# Altium PCB CoproMKII.PcbDoc (part 1 of 2)
Units mil, origin at the board's own origin, x right, y up, seen from the top; angles counter-clockwise.
Board outline 4000 x 4000 mil, 4 copper layers (Top Layer, Middle 1 Layer, Middle 2 Layer, Bottom Layer), stack 23.8 mil thick; 129 components, 100 nets, 483 pads, 174 vias.
Unrouted connection lines stored in the file: 51.
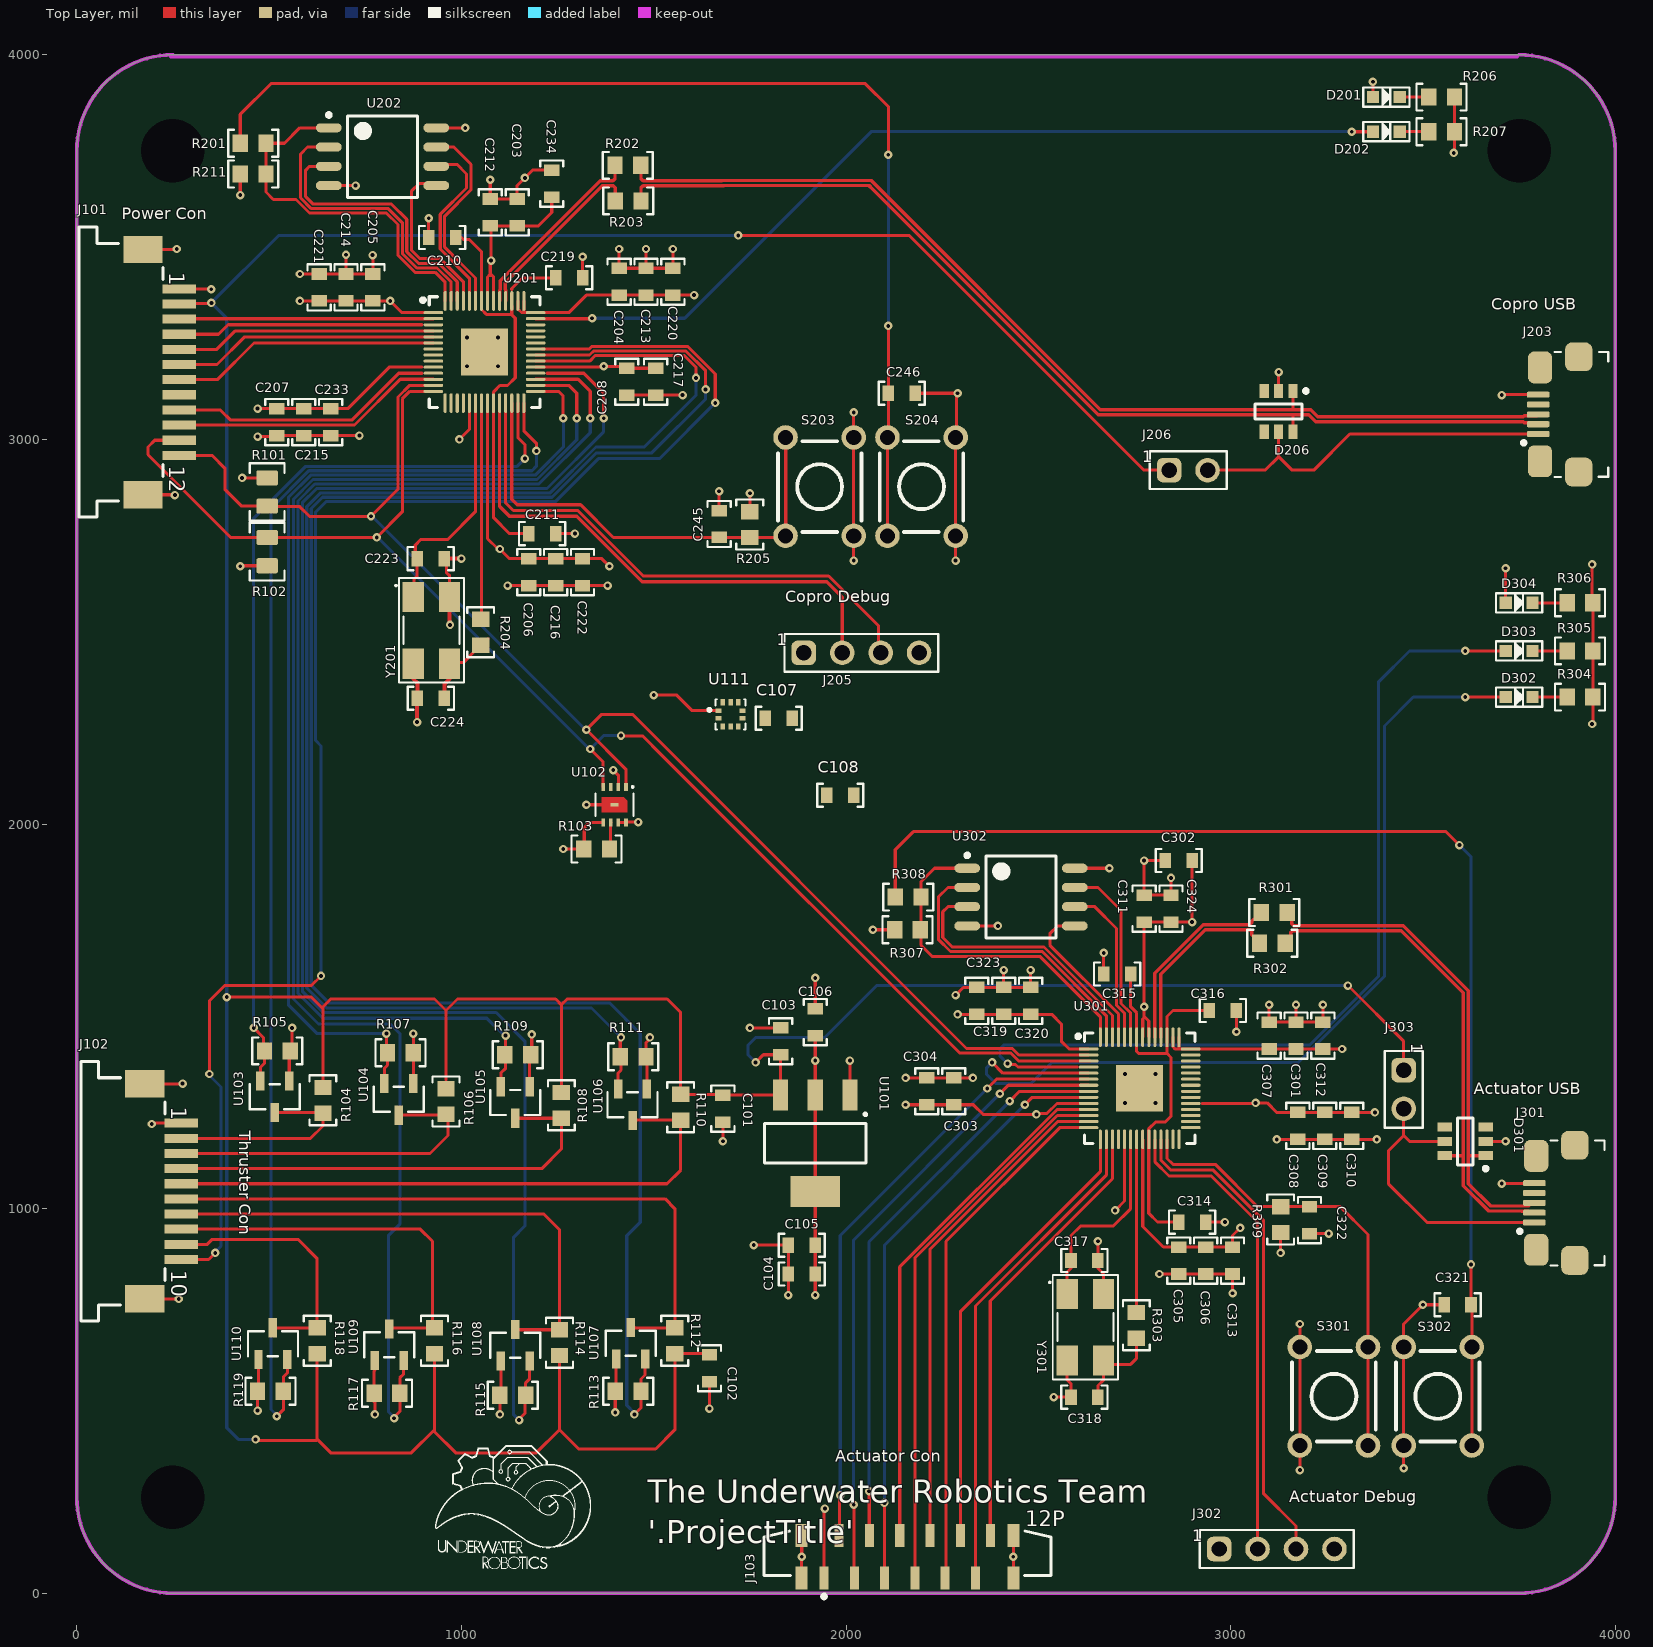
[diagram p0: Top Layer view]
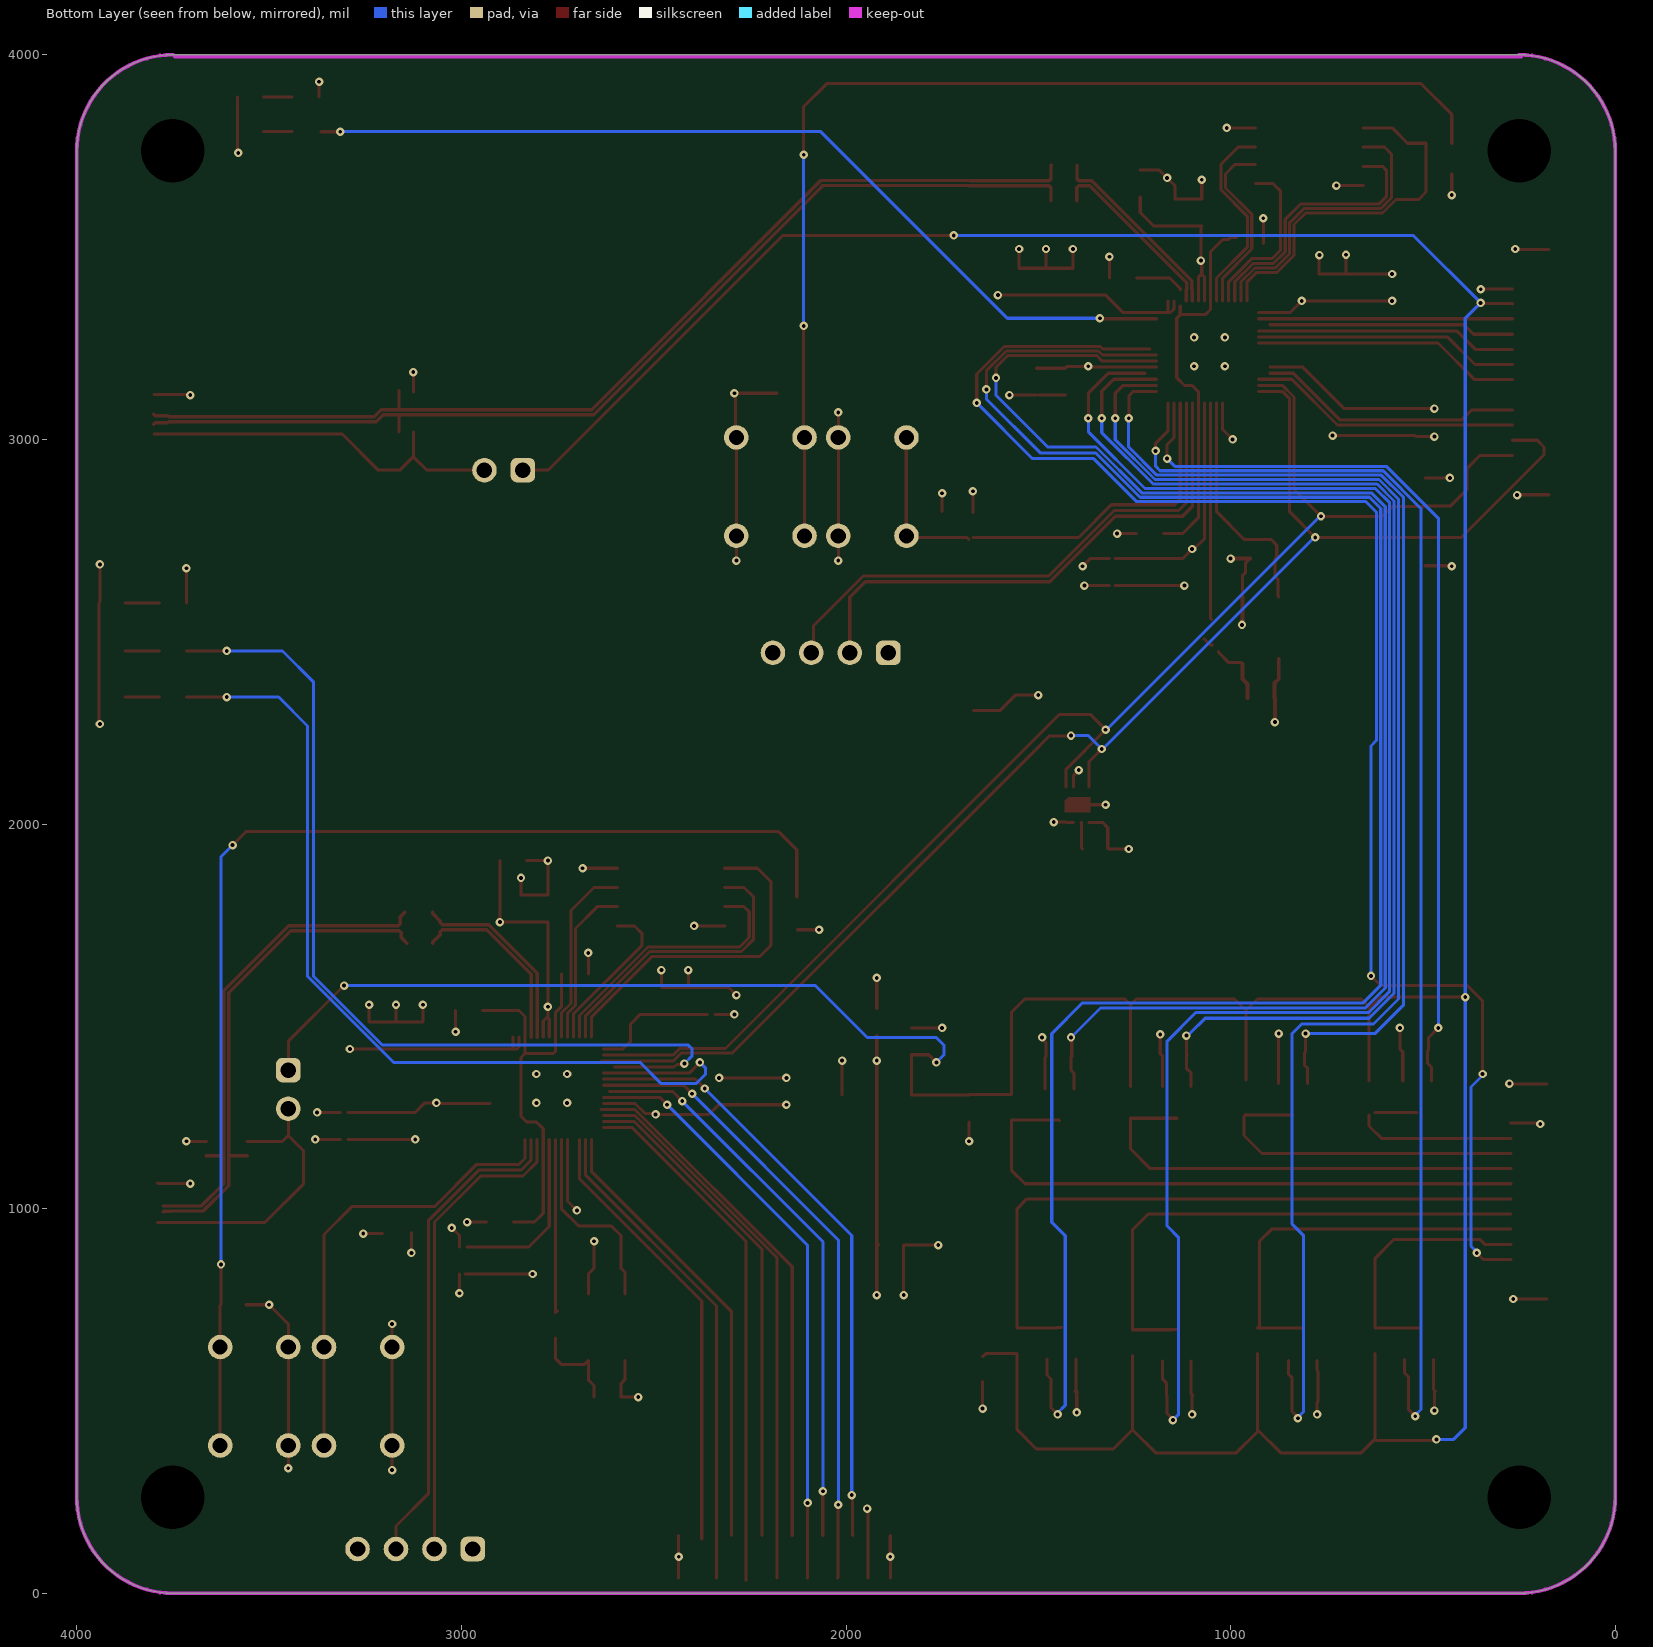
[diagram p1: Bottom Layer view, seen from below]
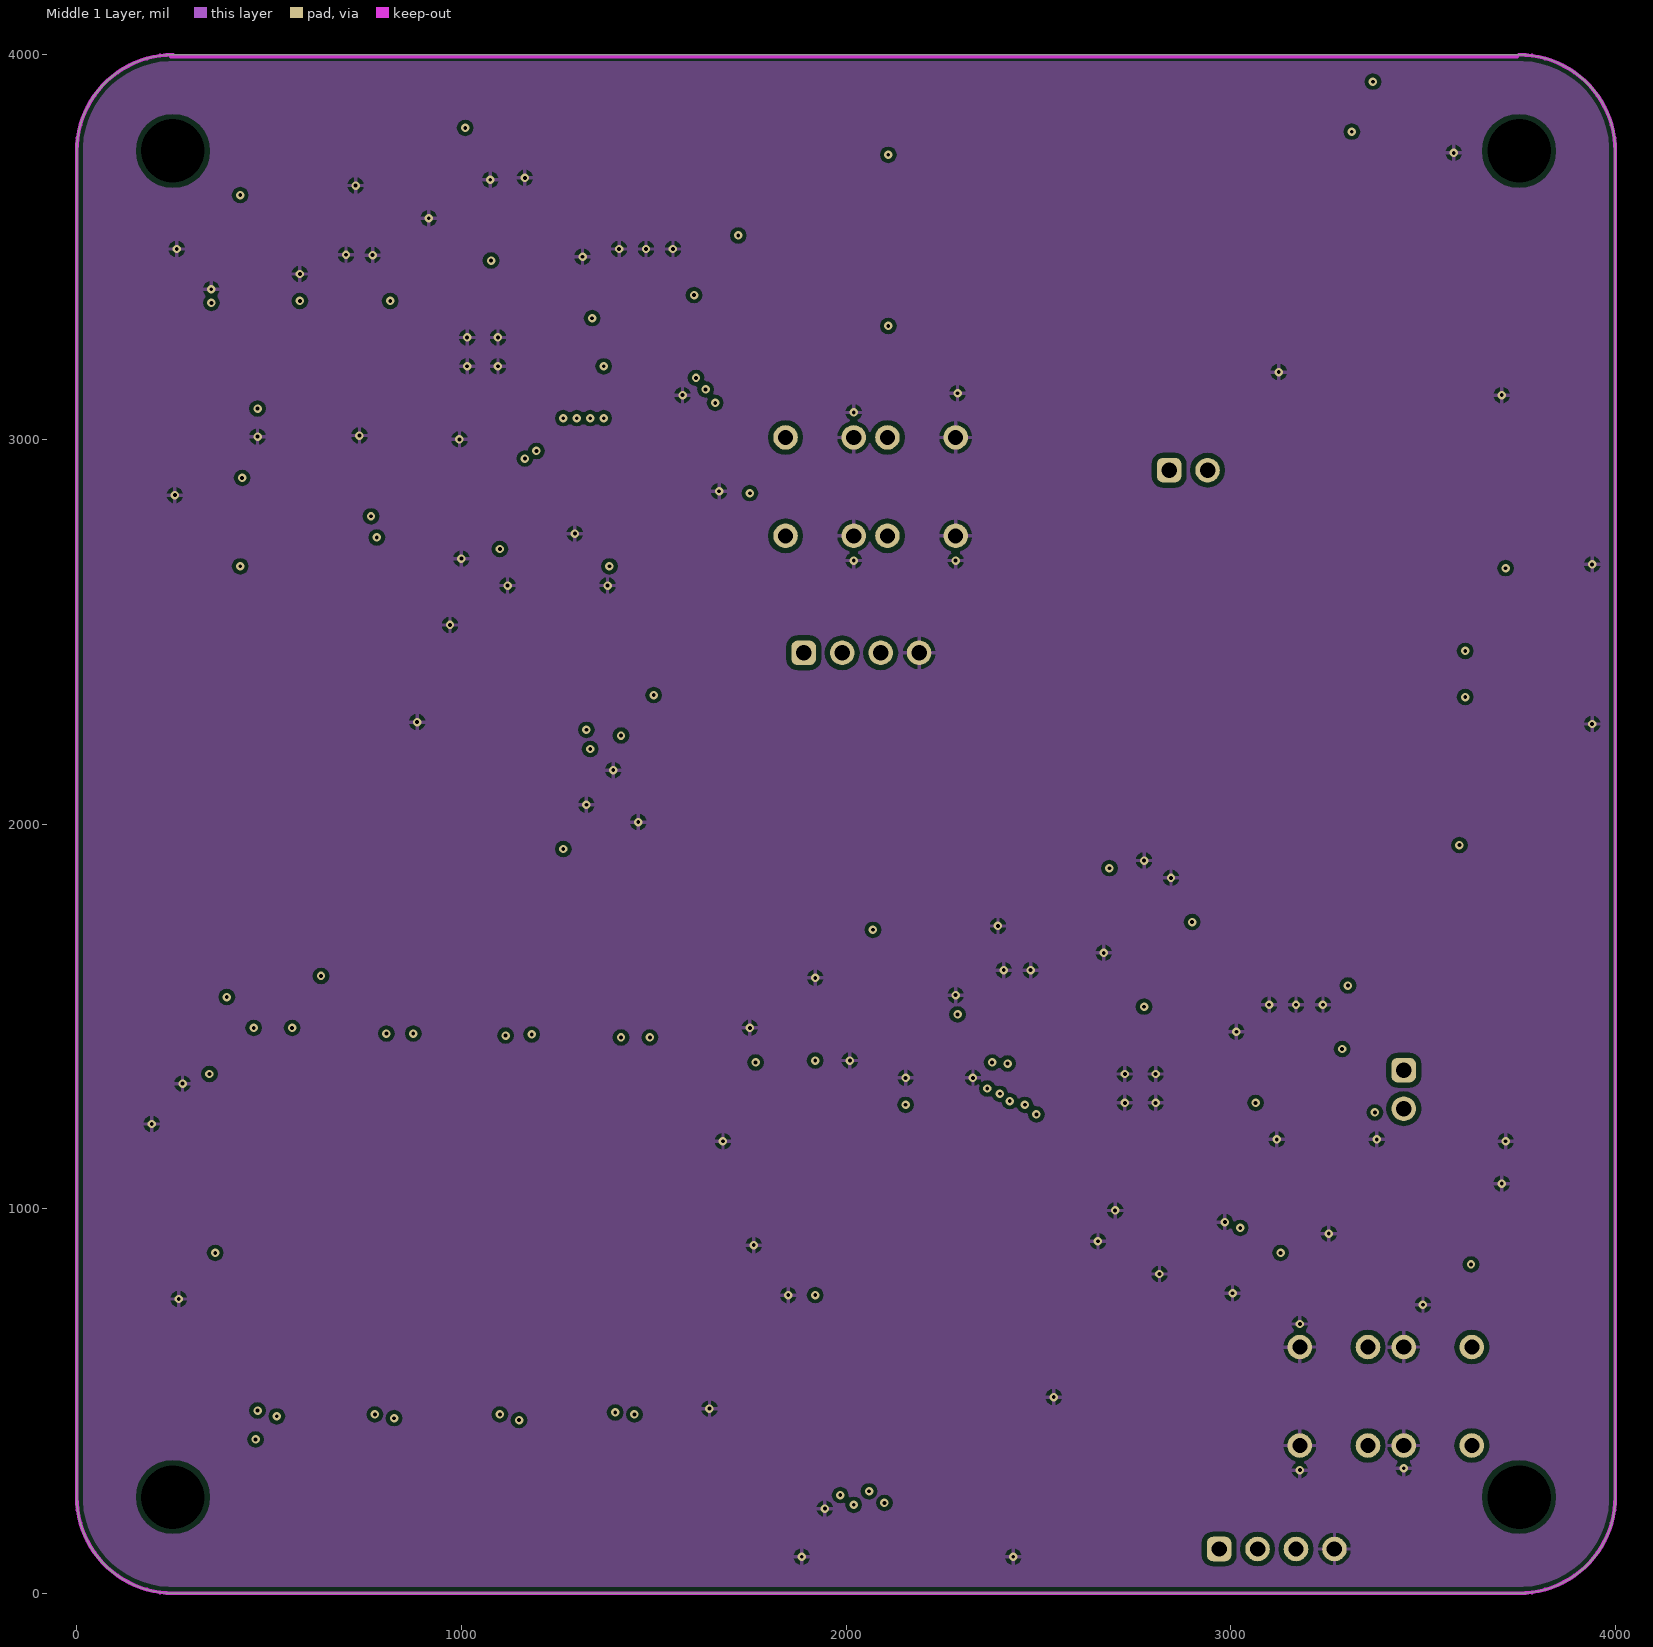
[diagram p2: Middle 1 Layer]
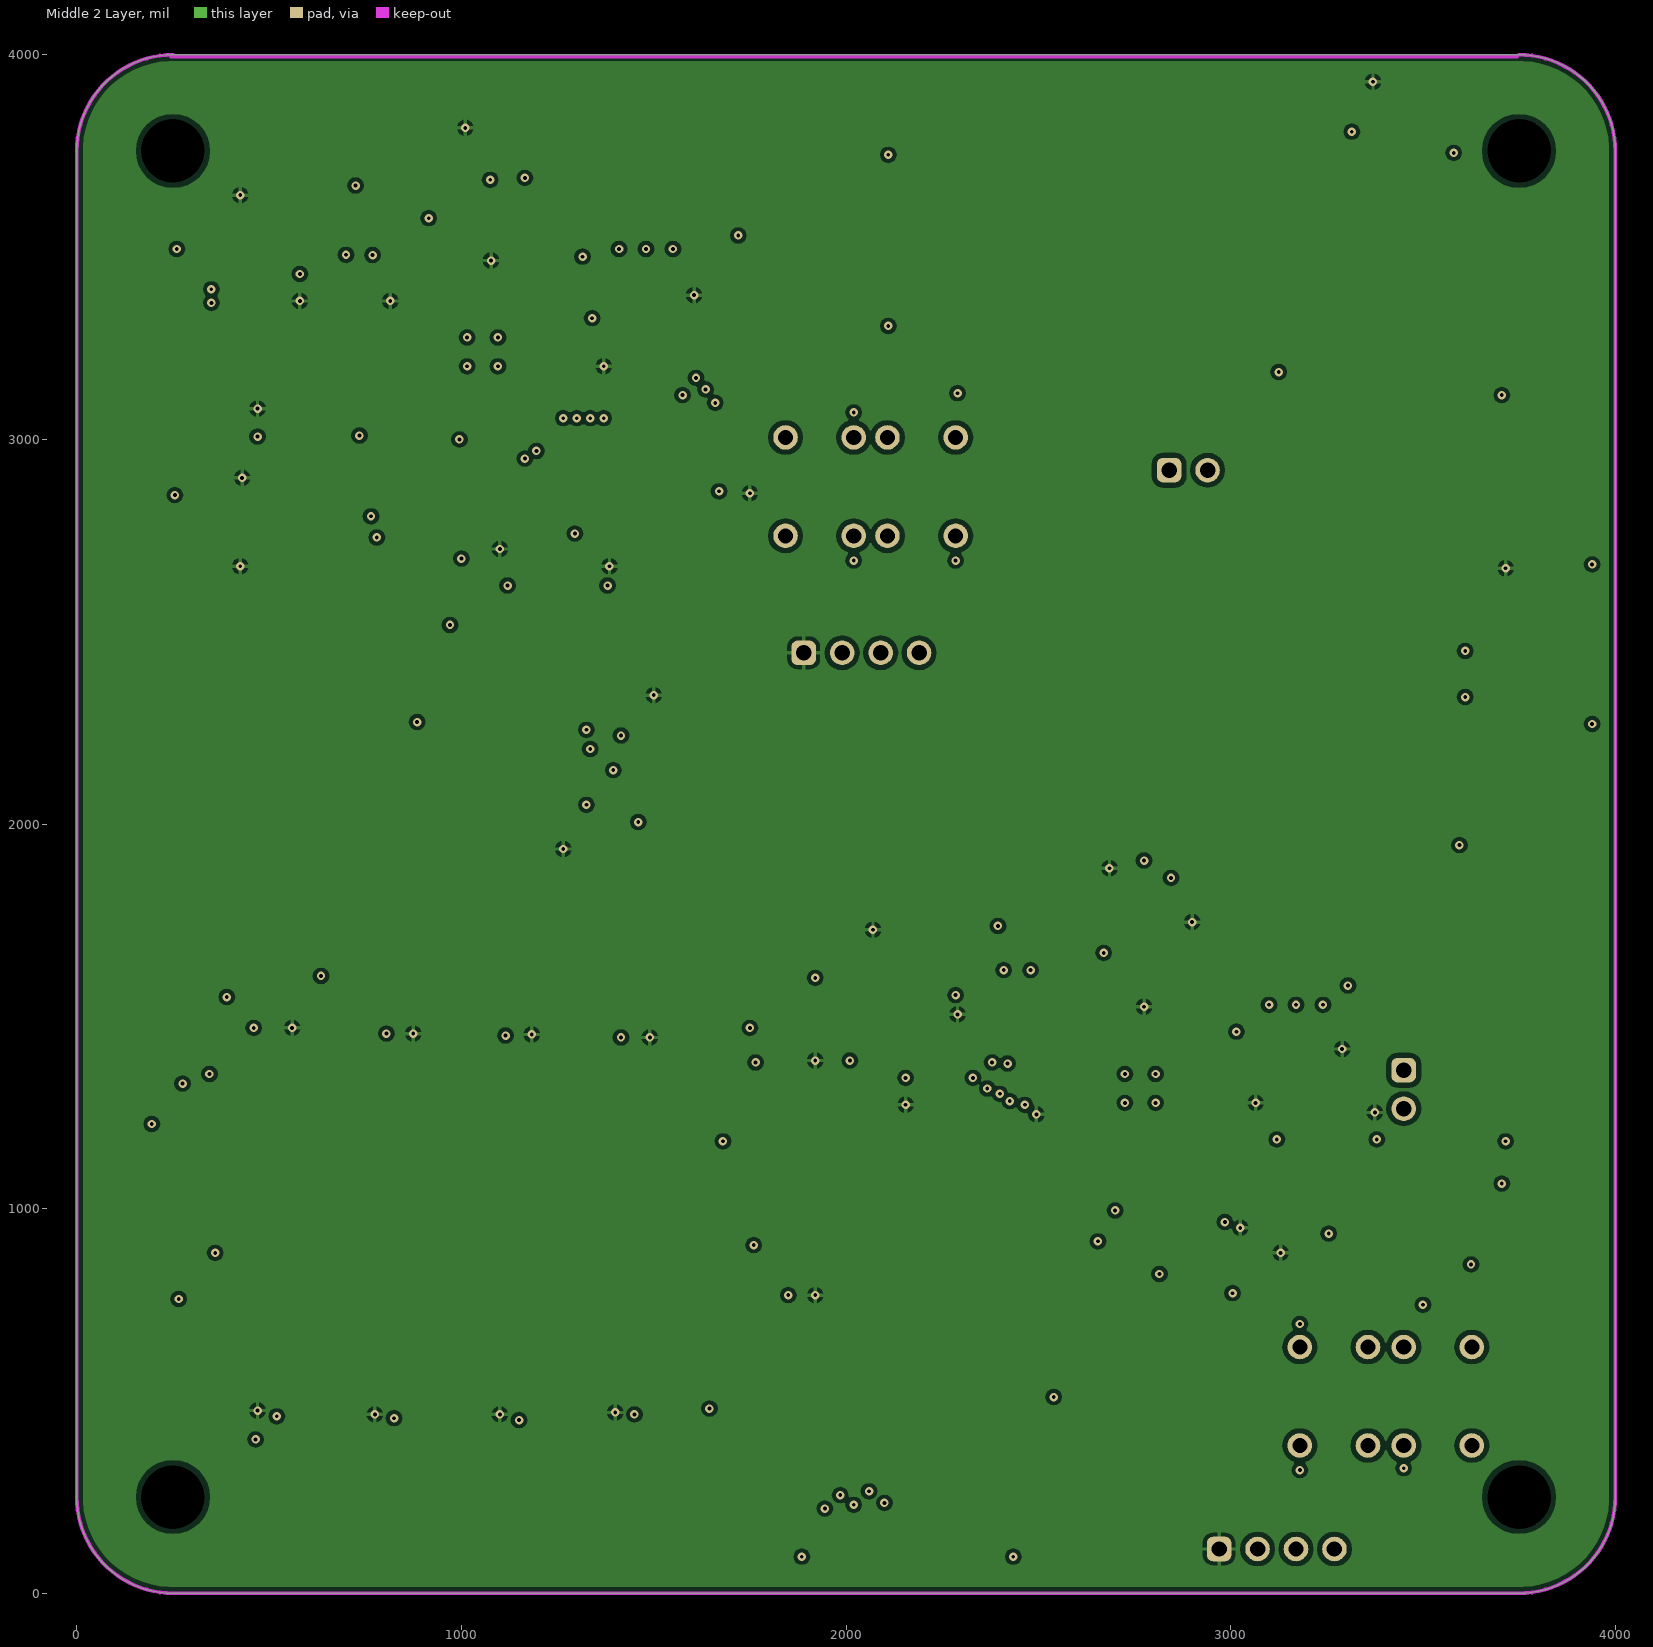
[diagram p3: Middle 2 Layer]
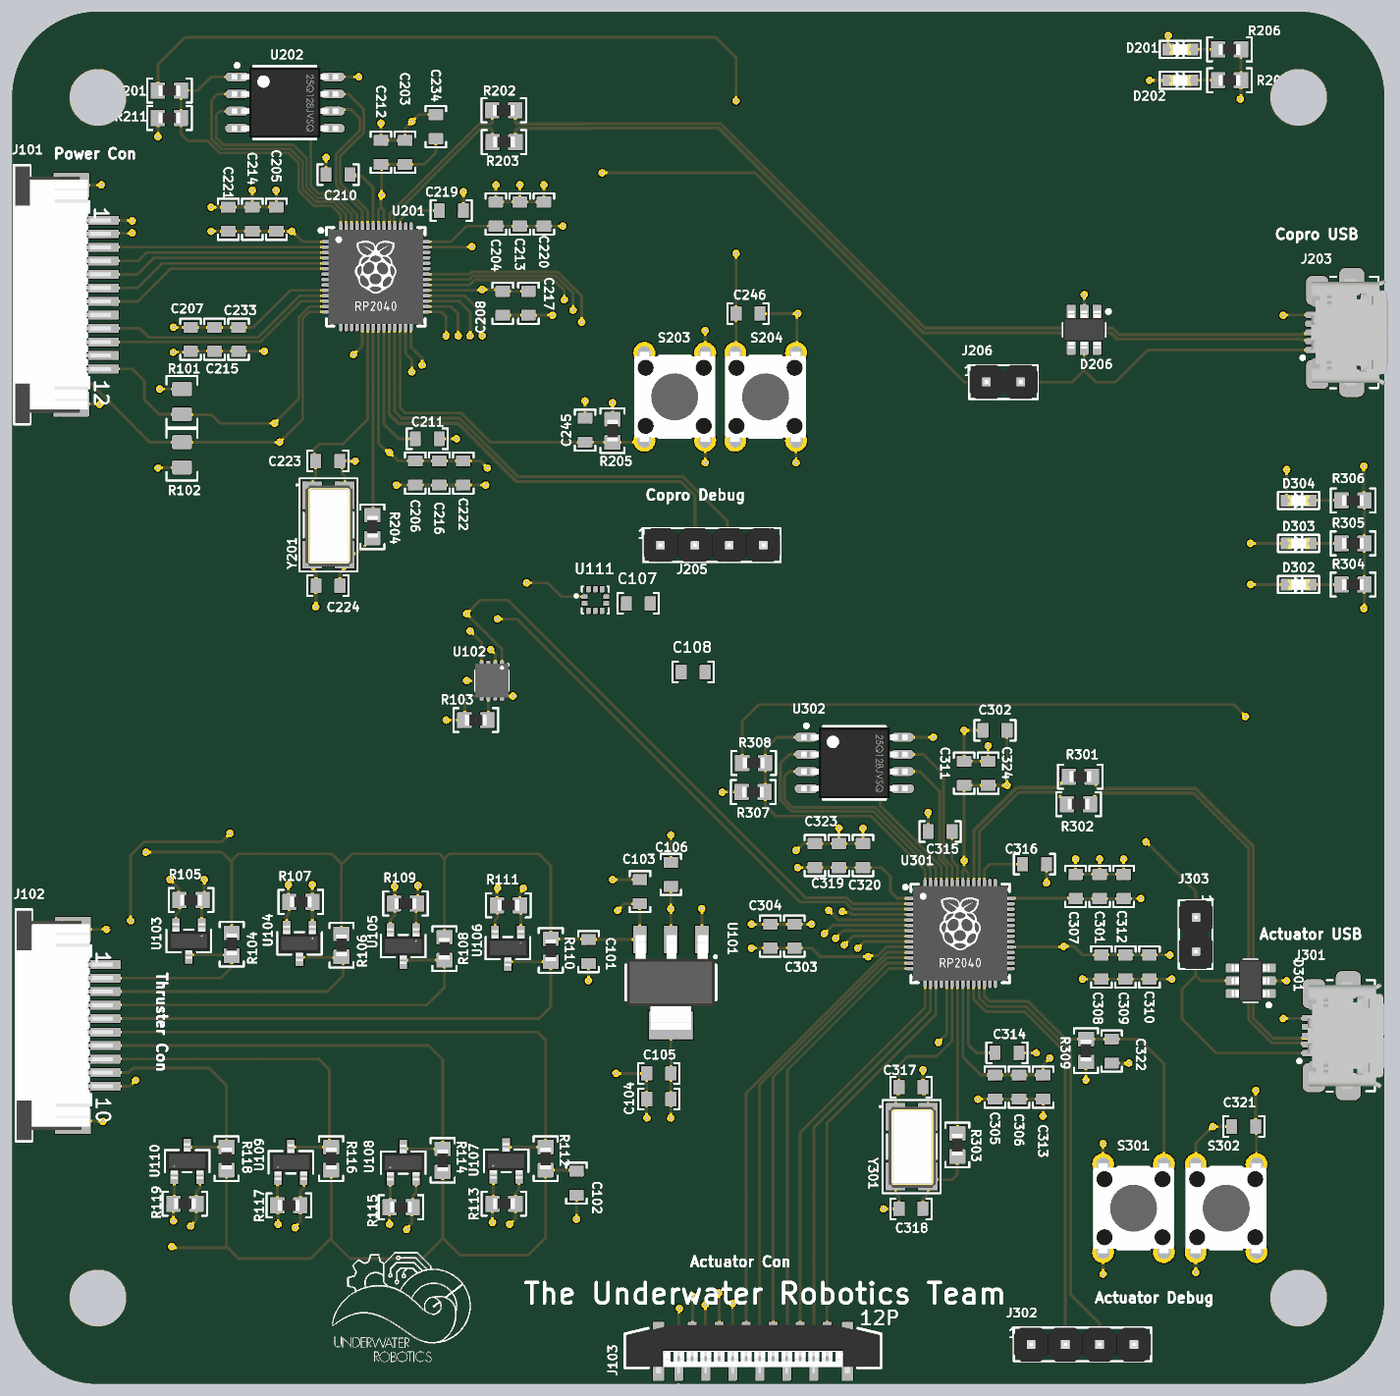
[diagram p5: 3D render of the assembled board from above, using the file's embedded part models]

## Layer stack, top to bottom
Top Solder: solder mask 0.4, Solder Resist, Dk 3.5
Top Layer: signal copper 1.4
Dielectric 1: prepreg 2.8, PP-006, Dk 4.1
Middle 1 Layer: signal copper 1.4
Dielectric 2: dielectric 12.6, FR-4, Dk 4.8
Middle 2 Layer: signal copper 1.4
Dielectric 3: prepreg 2.8, PP-006, Dk 4.1
Bottom Layer: signal copper 1.4
Bottom Solder: solder mask 0.4, Solder Resist, Dk 3.5

## Board outline
0,250 0,3750 cw(c250,3750) 250,4000 3750,4000 cw(c3750,3750) 4000,3750 4000,250 cw(c3750,250) 3750,0 250,0 cw(c250,250)

## Design rules (kind name [scope] priority, off if disabled: settings)
AcuteAngle [All] p1: minimum=8.75000000000000E+0001 checktracksonly=FALSE
BoardOutlineClearance [All] p1: gap=16 ignorepadtopadclearanceinfootprint=FALSE
Clearance "Clearance JLCPCB" [All] p1: gap=6 ignorepadtopadclearanceinfootprint=FALSE except(3.5: Arc-Arc Arc-Track Track-Track; 5: Arc-SMDPad Track-SMDPad SMDPad-SMDPad; 10: Arc-Via Arc-Hole Track-Via Track-Hole Via-Via Via-Fill Via-Poly Via-Region Fill-Hole Poly-Hole Region-Hole; 12.99: Arc-THPad Track-THPad; 13: THPad-Fill THPad-Poly THPad-Region; 20: THPad-THPad)
ComponentOrientations [All] p1: allowedrotations=32
DiffPairsRouting "USB 2.0" [InDifferentialPairClass('USB 2.0')] p1: maxlimit=6 minlimit=4 mostfreqgap=6 toplayer_maxgap=4 toplayer_prefgap=4 toplayer_minwidth=9 toplayer_maxwidth=9 toplayer_prefwidth=9 midlayer1_mingap=6 midlayer1_minwidth=2.53 midlayer1_maxwidth=2.53 midlayer1_prefwidth=2.53 midlayer2_mingap=6 midlayer2_minwidth=2.53 midlayer2_maxwidth=2.53 midlayer2_prefwidth=2.53 bottomlayer_maxgap=4 bottomlayer_prefgap=4 bottomlayer_minwidth=9 bottomlayer_maxwidth=9 bottomlayer_prefwidth=9 impedanceprofiledriven=TRUE impedanceprofileid={B279FAB8-9179-4BDF-8125-EF1A8961339F} maxuncoupledlength=500
DiffPairsRouting [All] p2: maxlimit=10 minlimit=10 mostfreqgap=10 toplayer_minwidth=15 toplayer_maxwidth=15 toplayer_prefwidth=15 midlayer1_minwidth=15 midlayer1_maxwidth=15 midlayer1_prefwidth=15 midlayer2_minwidth=15 midlayer2_maxwidth=15 midlayer2_prefwidth=15 bottomlayer_minwidth=15 bottomlayer_maxwidth=15 bottomlayer_prefwidth=15 maxuncoupledlength=500
FanoutControl Fanout_Default [All] p5: bgadir=Out bgaviamode=Centered fanoutstyle=Auto fanoutdirection=OutOnly viagrid=1 // Fanout_Default (Default Rule)
HoleSize "HoleSize JLCPCB" [All] p1: absolutevalues=TRUE maxlimit=245 minlimit=8 maxpercent=80.000 minpercent=20.000
HoleToHoleClearance "HoleToHoleClearance JLCPCB" [All] p1: gap=20 allowstackedmicrovias=TRUE
MinimumAnnularRing "MinimumAnnularRing JLCPCB" [All] p1: minimumring=6
MinimumSolderMaskSliver [All] p1 off: minsoldermaskwidth=10
PasteMaskExpansion [All] p1: expansion=1
PolygonConnect [All] p1: connectstyle=Relief reliefconductorwidth=10 reliefentries=4 polygonreliefangle="90 Angle" airgapwidth=10
RoomDefinition CoproMKII_Actuator [InComponentClass('CoproMKII_Actuator')] p1: confinementstyle=ConfineIn formatcopy=TRUE lockcomponents=FALSE outline -1000,-1000 1000,-1000 1000,0 -1000,0
RoutingLayers [All] p1: top layer_v5=TRUE mid layer 1_v5=FALSE mid layer 2_v5=FALSE bottom layer_v5=TRUE
RoutingVias "RoutingVias JLCPCB" [All] p1: holewidth=10 width=22 viastyle="Through Hole" minholewidth=8 minwidth=20 maxholewidth=28 maxwidth=40
SMDEntry [All] p1: side=TRUE corner=TRUE anyangle=FALSE
SMDToCorner [All] p1: distance=0
SMDToPlane [All] p1: distance=0
SilkToSilkClearance [All] p1: silktosilkclearance=1
SilkToSolderMaskClearance "SilkToSolderMaskClearance JLCPCB" [IsPad] p1: minsilkscreentomaskgap=6 clearancetoexposedcopper=TRUE
SolderMaskExpansion [All] p1: expansion=4 istentingtop=FALSE
SupplyNets "Schematic Supply Nets_4" [InNet('3V3_MCU')] p1: voltage=3.300
SupplyNets "Schematic Supply Nets_3" [InNet('1V1_MCU_Actuator')] p2: voltage=1.100
SupplyNets "Schematic Supply Nets_2" [InNet('1V1_MCU_Copro')] p3: voltage=1.100
UnRoutedNet [All] p1: checkbadconnections=TRUE
Width "Width JLCPCB 1oz" [All] p1: maxlimit=100 minlimit=3.5 preferedwidth=8 midlayer1_minwidth=5 midlayer2_minwidth=5 minimp=50.000000 maximp=50.000000 favimp=50.000000
20 further rules are at their usual default settings.

## Classes and differential pairs
component class CoproMKII_Actuator: C301 C302 C303 C304 C305 C306 C307 C308 C309 C310 C311 C312 C313 C314 C315 C316 C317 C318 C319 C320 C321 C322 C323 C324 D301 D302 D303 D304 J301 J302 J303 R301 R302 R303 R304 R305 R306 R307 R308 R309 S301 S302 U301 U302 Y301
differential pair class "USB 2.0": Actuator_USB Actuator_USB_PIN Copro_USB Copro_USB_PIN
component class CoproMKII_Coprocessor: C203 C204 C205 C206 C207 C208 C210 C211 C212 C213 C214 C215 C216 C217 C219 C220 C221 C222 C223 C224 C233 C234 C245 C246 D201 D202 D206 J203 J205 J206 R201 R202 R203 R204 R205 R206 R207 R211 S203 S204 U201 U202 Y201
component class CoproMKII_Connectors: C101 C102 C103 C104 C105 C106 C107 C108 J101 J102 J103 R101 R102 R103 R104 R105 R106 R107 R108 R109 R110 R111 R112 R113 R114 R115 R116 R117 R118 R119 U101 U102 U103 U104 U105 U106 U107 U108 U109 U110 U111
differential pair Actuator_USB: +Actuator_USB_P -Actuator_USB_N
differential pair Actuator_USB_PIN: +Actuator_USB_PIN_P -Actuator_USB_PIN_N
differential pair Copro_USB: +Copro_USB_P -Copro_USB_N
differential pair Copro_USB_PIN: +Copro_USB_PIN_P -Copro_USB_PIN_N

## Components (designator, comment, footprint, x,y, rotation, side; value= is the part's Value field where it differs from the comment)
C101 "100nF Ceramic 6.3V" CAPACITOR_0603 1680,1260 r270 top value=0.1uF
C102 "1uF Ceramic 16V" CAPACITOR_0603 1645,585 r270 top value=1uF
C103 "10uF Ceramic 6.3V" CAPACITOR_0603 1830,1435 r90 top
C104 "10uF Ceramic 6.3V" CAPACITOR_0603 1885,830 r180 top
C105 "1uF Ceramic 16V" CAPACITOR_0603 1885,905 r180 top value=1uF
C106 "100nF Ceramic 6.3V" CAPACITOR_0603 1920,1485 r90 top value=0.1uF
C107 "100nF Ceramic 6.3V" CAPACITOR_0603 1825,2275 r0 top value=0.1uF
C108 "100nF Ceramic 6.3V" CAPACITOR_0603 1985,2075 r0 top value=0.1uF
C203 "100nF Ceramic 6.3V" CAPACITOR_0603 1145,3590 r270 top value=0.1uF
C204 "100nF Ceramic 6.3V" CAPACITOR_0603 1410,3410 r270 top value=0.1uF
C205 "100nF Ceramic 6.3V" CAPACITOR_0603 770,3395 r270 top value=0.1uF
C206 "100nF Ceramic 6.3V" CAPACITOR_0603 1175,2655 r90 top value=0.1uF
C207 "100nF Ceramic 6.3V" CAPACITOR_0603 520,3045 r90 top value=0.1uF
C208 "100nF Ceramic 6.3V" CAPACITOR_0603 1430,3150 r90 top value=0.1uF
C210 "100nF Ceramic 6.3V" CAPACITOR_0603 950,3525 r0 top value=0.1uF
C211 "100nF Ceramic 6.3V" CAPACITOR_0603 1210,2755 r180 top value=0.1uF
C212 "1uF Ceramic 16V" CAPACITOR_0603 1075,3590 r270 top value=1uF
C213 "1uF Ceramic 16V" CAPACITOR_0603 1480,3410 r270 top value=1uF
C214 "1uF Ceramic 16V" CAPACITOR_0603 700,3395 r270 top value=1uF
C215 "1uF Ceramic 16V" CAPACITOR_0603 590,3045 r90 top value=1uF
C216 "1uF Ceramic 16V" CAPACITOR_0603 1245,2655 r90 top value=1uF
C217 "1uF Ceramic 16V" CAPACITOR_0603 1505,3150 r90 top value=1uF
C219 "1uF Ceramic 16V" CAPACITOR_0603 1280,3420 r180 top value=1uF
C220 "10uF Ceramic 6.3V" CAPACITOR_0603 1550,3410 r270 top
C221 "100nF Ceramic 6.3V" CAPACITOR_0603 630,3395 r90 top value=0.1uF
C222 "1uF Ceramic 16V" CAPACITOR_0603 1315,2655 r270 top value=1uF
C223 "27pF Ceramic 50V" CAPACITOR_0603 920,2690 r0 top value=27pF
C224 "27pF Ceramic 50V" CAPACITOR_0603 920.68,2326.86 r180 top value=27pF
C233 "100nF Ceramic 6.3V" CAPACITOR_0603 660,3045 r270 top value=0.1uF
C234 "1uF Ceramic 16V" CAPACITOR_0603 1235,3665 r90 top value=1uF
C245 "10nF Ceramic 6.3V" CAPACITOR_0603 1670,2780 r90 top value=0.01uF
C246 "10nF Ceramic 6.3V" CAPACITOR_0603 2145,3120 r0 top value=0.01uF
C301 "10uF Ceramic 6.3V" CAPACITOR_0603 3170,1450 r270 top
C302 "100nF Ceramic 6.3V" CAPACITOR_0603 2865,1905 r0 top value=0.1uF
C303 "100nF Ceramic 6.3V" CAPACITOR_0603 2280,1305 r270 top value=0.1uF
C304 "100nF Ceramic 6.3V" CAPACITOR_0603 2210,1305 r270 top value=0.1uF
C305 "100nF Ceramic 6.3V" CAPACITOR_0603 2865,865 r90 top value=0.1uF
C306 "100nF Ceramic 6.3V" CAPACITOR_0603 2935,865 r90 top value=0.1uF
C307 "100nF Ceramic 6.3V" CAPACITOR_0603 3100,1450 r270 top value=0.1uF
C308 "1uF Ceramic 16V" CAPACITOR_0603 3175,1215 r90 top value=1uF
C309 "1uF Ceramic 16V" CAPACITOR_0603 3245,1215 r90 top value=1uF
C310 "1uF Ceramic 16V" CAPACITOR_0603 3315,1215 r90 top value=1uF
C311 "1uF Ceramic 16V" CAPACITOR_0603 2775,1780 r270 top value=1uF
C312 "1uF Ceramic 16V" CAPACITOR_0603 3240,1450 r270 top value=1uF
C313 "1uF Ceramic 16V" CAPACITOR_0603 3005,865 r90 top value=1uF
C314 "1uF Ceramic 16V" CAPACITOR_0603 2900,965 r180 top value=1uF
C315 "100nF Ceramic 6.3V" CAPACITOR_0603 2705,1610 r0 top value=0.1uF
C316 "100nF Ceramic 6.3V" CAPACITOR_0603 2980,1515 r180 top value=0.1uF
C317 "27pF Ceramic 50V" CAPACITOR_0603 2620,865 r0 top value=27pF
C318 "27pF Ceramic 50V" CAPACITOR_0603 2620,510 r180 top value=27pF
C319 "100nF Ceramic 6.3V" CAPACITOR_0603 2410,1540 r90 top value=0.1uF
C320 "1uF Ceramic 16V" CAPACITOR_0603 2480,1540 r90 top value=1uF
C321 "10nF Ceramic 6.3V" CAPACITOR_0603 3590,750 r180 top value=0.01uF
C322 "10nF Ceramic 6.3V" CAPACITOR_0603 3205,970 r270 top value=0.01uF
C323 "100nF Ceramic 6.3V" CAPACITOR_0603 2340,1540 r90 top value=0.1uF
C324 "1uF Ceramic 16V" CAPACITOR_0603 2845,1780 r90 top value=1uF
D201 "IN-S63AT5G" LED_0603 3405,3890 r0 top
D202 "IN-S63AT5G" LED_0603 3405,3800 r0 top
D206 "TVS DIODE 5VWM 25VC SOT23-6" "SOT 23-6L" 3124.79,3072.71 r270 top
D301 "TVS DIODE 5VWM 25VC SOT23-6" "SOT 23-6L" 3610,1175 r180 top
D302 "IN-S63AT5G" LED_0603 3750,2330 r0 top
D303 "IN-S63AT5G" LED_0603 3750,2450 r0 top
D304 "IN-S63AT5G" LED_0603 3750,2575 r0 top
J101 "MkIICoproPB_FFC" 68611214122 115,3175 r270 top
J102 "MKIICopro_ESC" 68611014122 120,1045 r270 top
J103 "MKllCopro_Act" 686112183822 2159.4,110.63 r0 top
J203 "USB_MICRO R/A" CONN_MINIUSB 3905,3065 r90 top
J205 "CONN HEADER VERT 4POS 2.54MM" HEADER_4PIN_2.54MM 1890,2445 r0 top
J206 "2 POS" HEADER_2PIN_2.54MM 2840,2920 r0 top
J301 "USB_MICRO R/A" CONN_MINIUSB 3895,1015 r90 top
J302 "CONN HEADER VERT 4POS 2.54MM" HEADER_4PIN_2.54MM 2970,115 r0 top
J303 "2 POS" HEADER_2PIN_2.54MM 3450,1360 r270 top
R101 "4.7k Ohm 5% 1/8W" RESISTOR_0805 495,2863.19 r270 top
R102 "4.7k Ohm 5% 1/8W" RESISTOR_0805 495,2708.19 r90 top
R103 "10k Ohm 5% 1/10W" RESISTOR_0603 1351.5,1935 r0 top
R104 "10k Ohm 5% 1/10W" RESISTOR_0603 640,1281.5 r270 top
R105 "10k Ohm 5% 1/10W" RESISTOR_0603 521.5,1410 r180 top
R106 "10k Ohm 5% 1/10W" RESISTOR_0603 960,1278.5 r270 top
R107 "10k Ohm 5% 1/10W" RESISTOR_0603 841.5,1405 r180 top
R108 "10k Ohm 5% 1/10W" RESISTOR_0603 1260,1268.5 r270 top
R109 "10k Ohm 5% 1/10W" RESISTOR_0603 1146.5,1400 r180 top
R110 "10k Ohm 5% 1/10W" RESISTOR_0603 1570,1263.5 r270 top
R111 "10k Ohm 5% 1/10W" RESISTOR_0603 1446.5,1395 r180 top
R112 "10k Ohm 5% 1/10W" RESISTOR_0603 1555,656.5 r90 top
R113 "10k Ohm 5% 1/10W" RESISTOR_0603 1433.5,525 r0 top
R114 "10k Ohm 5% 1/10W" RESISTOR_0603 1255,651.5 r90 top
R115 "10k Ohm 5% 1/10W" RESISTOR_0603 1133.5,515 r0 top
R116 "10k Ohm 5% 1/10W" RESISTOR_0603 930,656.5 r90 top
R117 "10k Ohm 5% 1/10W" RESISTOR_0603 806.5,520 r0 top
R118 "10k Ohm 5% 1/10W" RESISTOR_0603 625,656.5 r90 top
R119 "10k Ohm 5% 1/10W" RESISTOR_0603 503.5,525 r0 top
R201 "1k Ohm 5% 1/8W" RESISTOR_0603 458.5,3770 r180 top
R202 "27 Ohm 5% 1/8W" RESISTOR_0603 1432.95,3712.38 r180 top
R203 "27 Ohm 5% 1/8W" RESISTOR_0603 1433.5,3620 r180 top
R204 "1k Ohm 5% 1/8W" RESISTOR_0603 1050,2498.5 r270 top
R205 "10k Ohm 5% 1/10W" RESISTOR_0603 1750,2778.5 r270 top
R206 "62 Ohm 1% 1/4W" RESISTOR_0603 3548.5,3890 r180 top
R207 "62 Ohm 1% 1/4W" RESISTOR_0603 3548.5,3800 r180 top
R211 "10k Ohm 5% 1/10W" RESISTOR_0603 458.5,3690 r180 top
R301 "27 Ohm 5% 1/8W" RESISTOR_0603 3113.5,1770 r180 top
R302 "27 Ohm 5% 1/8W" RESISTOR_0603 3108.5,1690 r180 top
R303 "1k Ohm 5% 1/8W" RESISTOR_0603 2755,696.5 r270 top
R304 "62 Ohm 1% 1/4W" RESISTOR_0603 3908.5,2330 r180 top
R305 "62 Ohm 1% 1/4W" RESISTOR_0603 3908.5,2450 r180 top
R306 "62 Ohm 1% 1/4W" RESISTOR_0603 3908.5,2575 r180 top
R307 "10k Ohm 5% 1/10W" RESISTOR_0603 2160,1725 r180 top
R308 "1k Ohm 5% 1/8W" RESISTOR_0603 2161.5,1810 r180 top
R309 "10k Ohm 5% 1/10W" RESISTOR_0603 3130,971.5 r90 top
S203 "SPST Tactile Switch" TactileSwitch 1842.83,2749.09 r90 top
S204 "SPST Tactile Switch" TactileSwitch 2107.83,2749.09 r90 top
S301 "SPST Tactile Switch" TactileSwitch 3357.17,640 r270 top
S302 "SPST Tactile Switch" TactileSwitch 3627.17,640 r270 top
U101 "LM1117IMPX-3.3/NOPB" SOT-223-4 1920,1170 r270 top
U102 "STS-31-DIS" 8-TDFN 1398.19,2050 r270 top
U103 "AO3404A" SOT-23-3 515,1291 r180 top
U104 "AO3404A" SOT-23-3 837.5,1284 r180 top
U105 "AO3404A" SOT-23-3 1140,1276 r180 top
U106 "AO3404A" SOT-23-3 1445,1270 r180 top
U107 "AO3404A" SOT-23-3 1440,650 r0 top
U108 "AO3404A" SOT-23-3 1140,645 r0 top
U109 "AO3404A" SOT-23-3 812.5,646 r0 top
U110 "AO3404A" SOT-23-3 510,649 r0 top
U111 "ILPS22QSTR" LGA10R50P2X3_200X200X80 1699.82,2285 r0 top
U201 "RP2040" "QFN-56 RP2040" 1060.12,3227.13 r0 top
U202 "W25Q128JVSIQ" "SOIC-8 W25QxJV" 795,3735 r0 top
U301 "RP2040" "QFN-56 RP2040" 2763.62,1312.87 r0 top
U302 "W25Q128JVSIQ" "SOIC-8 W25QxJV" 2455,1810 r0 top
Y201 "CRYSTAL 12.0000MHZ 18PF SMD" "4-SMD No Lead Crystal" 875,2590 r270 top
Y301 "CRYSTAL 12.0000MHZ 18PF SMD" "4-SMD No Lead Crystal" 2575,778.23 r270 top

## Footprints (in the part's own frame and the unit in brackets; to place one, negate y for a bottom-side part, rotate by r counter-clockwise, add the part's x,y. Pads: shape width x height; smd on the part's side, far side on the other; paste and mask are expansions set on the pad)
"4-SMD No Lead Crystal" [mm]
  rect 2x1.4 smd: 1(0,0) 2(4.4,0) 3(4.4,2.4) 4(0,2.4)
  silkscreen extent -1.25,-1.2 5.65,3.35, body extent -0.74,-0.51 5.26,2.99, height 1.11
8-TDFN [mm] "8 Pin DFN Package (2.5x2.5)"
  rrect5% 0.55x0.25 smd: 1(-1.175,0.75) 2(-1.175,0.25) 3(-1.175,-0.25) 4(-1.175,-0.75) 5(1.175,-0.75) 6(1.175,-0.25) 7(1.175,0.25) 8(1.175,0.75)
  rrect50% 0.25x0.55 smd: 9(0,0)
  Top Layer region: 0.5,-0.85 -0.5,-0.85 -0.5,0.6 -0.25,0.85 0.5,0.85
  silkscreen extent -1.24,-1.25 0.75,1.26, body extent -1.26,-1.25 1.26,1.25, height 1.02
68611014122 [mm] "ZIF Connectors, Horizontal, Top Contact, pitch 1mm, 10p"
  rect 0.6x2.2 smd: 1(-4.5,3.85) 2(-3.5,3.85) 3(-2.5,3.85) 4(-1.5,3.85) 5(-0.5,3.85) 6(0.5,3.85) 7(1.5,3.85) 8(2.5,3.85) 9(3.5,3.85) 10(4.5,3.85)
  rect 1.8x2.6 smd: MP1(-7.1,1.45) MP2(7.1,1.45)
  silkscreen extent -8.58,-2.78 8.58,2.78, body extent -8.5,-2.7 8.5,4.4, height 3.02
68611214122 [mm] "ZIF Connectors, Horizontal, Top Contact, pitch 1mm, 12p"
  rect 0.6x2.2 smd: 1(-5.5,3.85) 2(-4.5,3.85) 3(-3.5,3.85) 4(-2.5,3.85) 5(-1.5,3.85) 6(-0.5,3.85) 7(0.5,3.85) 8(1.5,3.85) 9(2.5,3.85) 10(3.5,3.85) 11(4.5,3.85) 12(5.5,3.85)
  rect 1.8x2.6 smd: MP1(-8.1,1.45) MP2(8.1,1.45)
  silkscreen extent -9.57,-2.78 9.58,2.78, body extent -9.5,-2.7 9.5,4.4, height 3.02
686112183822 [mm] "ZIF Connectors, Vertical, Type A, pitch 1mm, 12p"
  rect 0.6x1.5 smd: 1(-5.5,-1.8) 2(-4.5,1) 3(-3.5,-1.8) 4(-2.5,1) 5(-1.5,-1.8) 6(-0.5,1) 7(0.5,-1.8) 8(1.5,1) 9(2.5,-1.8) 10(3.5,1) 11(4.5,-1.8) 12(5.5,1)
  rect 0.8x1.5 smd: MP1(-7,-1.8) MP2(-7,1) MP3(7,1) MP4(7,-1.8)
  silkscreen extent -9.47,-3.15 9.48,1.31, body extent -9.4,-2.05 9.4,1.55, height 4
CAPACITOR_0603 [mil] "CAPACITOR 0603"
  rect 30x40 smd: 1(-35,0) 2(35,0)
  silkscreen extent -60,-30 60,30, body extent -31,-16 32,16, height 31
CONN_MINIUSB [mm] "USB2.0 Micro-B Receptacle SMD R/A"
  rrect50% 0.4x1.5 smd: 1(-1.3,2.675) 2(-0.65,2.675) 3(0,2.675) 4(0.65,2.675) 5(1.3,2.675)
  rrect50% 2.1x1.6 smd: 6(-3.1,2.55) 7(3.1,2.55)
  rrect50% 1.9x1.8 smd: 8(3.8,0) 9(-3.8,0)
  silkscreen extent -4.14,-1.96 4.11,3.75, body extent -3.96,-2.67 3.96,2.99, height 2.72
HEADER_2PIN_2.54MM [mm]
  rrect50% 1.62x1.62 hole 1.02: 1(0,0)
  round 1.62 hole 1.02: 2(2.54,0)
  silkscreen extent -1.27,-1.25 3.81,1.25, body extent -1.27,-1.25 3.81,1.29, height 8.39
HEADER_4PIN_2.54MM [mm]
  rrect50% 1.62x1.62 hole 1.02: 1(0,0)
  round 1.62 hole 1.02: 2(2.54,0) 3(5.08,0) 4(7.62,0)
  silkscreen extent -1.27,-1.25 8.89,1.25, body extent -1.27,-1.27 8.89,1.27, height 10.48
LED_0603 [mil] "LED 0603"
  rect 32x32 smd: 1(-35,0) 2(35,0)
  silkscreen extent -60,-25 60,25, body extent -31,-16 32,16, height 28
LGA10R50P2X3_200X200X80 [mm]
  rect 0.4x0.3 smd: 1(-0.8,0.25) 2(-0.8,-0.25) 6(0.8,-0.25) 7(0.8,0.25)
  rect 0.3x0.4 smd: 3(-0.5,-0.8) 4(0,-0.8) 5(0.5,-0.8) 8(0.5,0.8) 9(0,0.8) 10(-0.5,0.8)
  silkscreen extent -1.5,-1 1,1
"QFN-56 RP2040" [mm] "QFN, 56-Leads, Body 7.00x7.00mm, Pitch 0.40mm, Thermal Pad 3.10x3.10mm, IPC Medium Density"
  oval 1.3x0.2 smd: 1(-3.375,2.6) 2(-3.375,2.2) 3(-3.375,1.8) 4(-3.375,1.4) 5(-3.375,1) 6(-3.375,0.6) 7(-3.375,0.2) 8(-3.375,-0.2) 9(-3.375,-0.6) 10(-3.375,-1) 11(-3.375,-1.4) 12(-3.375,-1.8) 13(-3.375,-2.2) 14(-3.375,-2.6) 29(3.375,-2.6) 30(3.375,-2.2) 31(3.375,-1.8) 32(3.375,-1.4) 33(3.375,-1) 34(3.375,-0.6) 35(3.375,-0.2) 36(3.375,0.2) 37(3.375,0.6) 38(3.375,1) 39(3.375,1.4) 40(3.375,1.8) 41(3.375,2.2) 42(3.375,2.6)
  oval 0.2x1.3 smd: 15(-2.6,-3.375) 16(-2.2,-3.375) 17(-1.8,-3.375) 18(-1.4,-3.375) 19(-1,-3.375) 20(-0.6,-3.375) 21(-0.2,-3.375) 22(0.2,-3.375) 23(0.6,-3.375) 24(1,-3.375) 25(1.4,-3.375) 26(1.8,-3.375) 27(2.2,-3.375) 28(2.6,-3.375) 43(2.6,3.375) 44(2.2,3.375) 45(1.8,3.375) 46(1.4,3.375) 47(1,3.375) 48(0.6,3.375) 49(0.2,3.375) 50(-0.2,3.375) 51(-0.6,3.375) 52(-1,3.375) 53(-1.4,3.375) 54(-1.8,3.375) 55(-2.2,3.375) 56(-2.6,3.375)
  rect 3.1x3.1 smd: 57(0,0)
  silkscreen extent -4.19,-3.65 3.65,3.65, body extent -3.52,-3.52 3.52,3.52, height 0.85
RESISTOR_0603 [mil] "Resistor 0603"
  rect 40x45 smd: 1(-33.5,0) 2(33.5,0)
  silkscreen extent -65,-35 65,35, body extent -31,-16 32,16, height 16
RESISTOR_0805 [mm]
  rrect25% 1x1.42 smd: 1(-0.935,0) 2(0.935,0)
  silkscreen extent -1.91,-1.14 1.91,1.14
"SOIC-8 W25QxJV" [mm] "SOIC, 8-Leads, Body 5.28x5.28mm, Pitch 1.27mm, IPC Medium Density"
  oval 1.7x0.6 smd: 1(-3.55,1.905) 2(-3.55,0.635) 3(-3.55,-0.635) 4(-3.55,-1.905) 5(3.55,-1.905) 6(3.55,-0.635) 7(3.55,0.635) 8(3.55,1.905)
  silkscreen extent -3.67,-2.7 2.3,2.88, body extent -3.95,-2.62 3.95,2.62, height 1.95
"SOT 23-6L" [mm] "SOT23, 6-Leads, Body 2.95x2.80mm, Pitch 0.95mm, IPC Medium Density"
  rect 0.95x0.6 smd: 1(-1.35,0.95) 2(-1.35,0) 3(-1.35,-0.95) 4(1.35,-0.95) 5(1.35,0) 6(1.35,0.95)
  silkscreen extent -1.47,-1.55 0.5,1.93, body extent -1.4,-1.55 1.4,1.55, height 1.45
SOT-23-3 [mil]
  rect 22x50 smd paste+0 mask+4: 1(-37.5,-41) 2(37.5,-41) 3(0,41)
  silkscreen extent -65,-33 65,33, body extent -60,-52 60,52, height 44
SOT-223-4 [mm]
  rect 2.05x1 smd paste+0 mask+0.102: 1(-3.175,2.3) 2(-3.175,0) 3(-3.175,-2.3)
  rect 2.05x3.25 smd paste+0 mask+0.102: 4(3.175,0)
  silkscreen extent -1.96,-3.35 1.3,3.35, body extent -3.5,-3.25 3.5,3.25, height 1.68
TactileSwitch [mm]
  round 1.62 hole 1: 1(0,0) 2(6.5,0) 3(0,-4.5) 4(6.5,-4.5)
  silkscreen extent 0.25,-5.01 6.25,0.51, body extent -0.6,-5.24 7.1,0.76, height 7.01

## Part data
C101 C106 C107 C108 C203 C204 C205 C206 C207 C208 C210 C211 C221 C233 C302 C303 C304 C305 C306 C307 C315 C316 C319 C323: library part CAPACITOR_0.1uF_0603, "Cap 100nF 6.3V +/-10% / Ceramic 0603", Supplier Part Number 1=399-15351-1-ND, Tolerance="+/- 10%", Voltage=6.3V, ComponentLink1Description=Datsheet, ComponentLink1URL=https://www.mouser.com/datasheet/2/212/KEM_C1002_X7R_SMD-1102033.pdf, Made By="Flip B", Supplier 1=Digi-Key
C102 C105 C212 C213 C214 C215 C216 C217 C219 C222 C234 C308 C309 C310 C311 C312 C313 C314 C320 C324: library part CAPACITOR_1uF_0603, "Cap 1uF 16V +/-10% / Ceramic 0603", Supplier Part Number 1=399-7847-1-ND, Tolerance="+/- 10%", Voltage=16V, Made By="Flip B", Supplier 1=Digi-Key
C103 C104 C220 C301: library part CAPACITOR_10uF_0603, "Cap 10uF 6.3V +/-20% / Ceramic 0603", Supplier Part Number 1=1276-1119-1-ND, Tolerance="+/- 20%", Value (uF)=10, Voltage=6.3V, ComponentLink1Description=Digikey, ComponentLink1URL=https://www.digikey.com/en/products/detail/samsung-electro-mechanics/CL10A106MQ8NNNC/3886777, Made By="Flip B", Supplier 1=Digi-Key
C223 C224 C317 C318: library part CAPACITOR_0.000027uF_0603, "Cap 27pF 50V +/-5% / Ceramic 0603", Supplier Part Number 1=311-1063-1-ND, Tolerance="+/- 5%", Voltage=50V, ComponentLink1Description=Datsheet, ComponentLink1URL=https://www.mouser.com/datasheet/2/212/KEM_C1002_X7R_SMD-1102033.pdf, Made By="Flip B", Supplier 1=Digi-Key
C245 C246 C321 C322: library part CAPACITOR_0.01uF_0603, "Cap 10nF 6.3V +/-20% / Ceramic 0603", Supplier Part Number 1=80-C0603C103K9R, Tolerance="+/- 10%", Voltage=6.3V, ComponentLink1Description=Datsheet, ComponentLink1URL=https://www.mouser.com/datasheet/2/212/KEM_C1002_X7R_SMD-1102033.pdf, Made By="Flip B", Supplier 1=Mouser
D201 D202 D302 D303 D304: library part LED_Green_0603_3V, "LED Green Vf= 3V If = 0.005A / IN-S63AT5G", Color=Green, Forward Current=5mA, Forward Voltage=3V, Package=0603, Supplier Part Number 1=1830-1062-1-ND, ComponentLink1Description=Datasheet, ComponentLink1URL=https://www.we-online.de/katalog/datasheet/150060GS75000.pdf, Made By="Robert Pafford", Supplier 1=Digi-Key
D206 D301: library part RCLAMP0504S.TCT, "25V Clamp 6A (8/20µs) Ipp Tvs Diode Surface Mount SOT-23-6", Breakdown Voltage (Min)=6V, Clamping Voltage (Max)=25V, Reverse Standoff Voltage (Typ)=5V, Supplier Part Number 1=RCLAMP0504SCT-ND, Made By="Robert Pafford", Supplier 1=Digi-Key
J101: "WR-FPC SMT ZIF Horizontal Top Contact, pitch 1mm, 12p", Contact Resistance=20mOhm, Manufacturer="Wurth Elektronik", Manufacturer Part Number=68611214122, Operating Temperature="-25 to +85degC", Rated Current=1A, Working Voltage=125VAC, ComponentLink1Description=Manufacturer, ComponentLink1URL=http://www.we-online.de, ComponentLink2Description=Datasheet, ComponentLink2URL=https://katalog.we-online.com/em/datasheet/68611214122.pdf, Length=19mm, Mounting Technology=SMT, Packaging="Tape and Reel", Pin Number=12, Pitch=1mm, Published Date="March 2021", Type=Horizontal
J102: "WR-FPC SMT ZIF Horizontal Top Contact, pitch 1mm, 10p", Contact Resistance=20mOhm, Manufacturer="Wurth Elektronik", Manufacturer Part Number=68611014122, Operating Temperature="-25 to +85degC", Rated Current=1A, Working Voltage=125VAC, ComponentLink1Description=Manufacturer, ComponentLink1URL=http://www.we-online.de, ComponentLink2Description=Datasheet, ComponentLink2URL=https://katalog.we-online.com/em/datasheet/68611014122.pdf, Length=17mm, Mounting Technology=SMT, Packaging="Tape and Reel", Pin Number=10, Pitch=1mm, Published Date="March 2021", Type=Horizontal
J103: "WR-FPC SMT ZIF Vertical Type A, pitch 1mm, 12p", Contact Resistance=30mOhm, Manufacturer="Wurth Elektronik", Manufacturer Part Number=686112183822, Operating Temperature="-25 to +85degC", Rated Current=1A, Working Voltage=125VAC, ComponentLink1Description=Manufacturer, ComponentLink1URL=http://www.we-online.de, ComponentLink2Description=Datasheet, ComponentLink2URL=https://katalog.we-online.com/em/datasheet/686112183822.pdf, Length=18.8mm, Mounting Technology=SMT, Packaging="Tape and Reel", Pin Number=12, Pitch=1mm, Published Date="March 2021", Type=Vertical
J203 J301: library part CONN_MICROUSB, "Amphenol Micro USB-B / USB2.0 5 Pin Right Angle SMD", Color=Silver, Current Per Pin=1.8A, Manufacturer=Amphenol, Supplier Part Number 1=609-4613-1-ND, ComponentLink1Description=Datasheet, ComponentLink1URL=https://cdn.amphenol-icc.com/media/wysiwyg/files/documentation/datasheet/inputoutput/io_usb_micro.pdf?__cf_chl_jschl_tk__=05693735e19256298f6ef6ca2bb2e65c376a4f56-1625503833-0-Abitsb0-ufjOXJYs_S3J3r2iTn-nObalbmXUksF1VvO_h_WEmRdMlUD1I8-hmWSEVWzY1pirKnrPZWfgY3851qyBZe5ZvnNQePLGIzUgdEIQBVUyW36RsbYpDLEWxJ4horD-5gChFgobLYqwmG5aHl0E8lIn_twwPPrOxilK2gP0q9t_CNOs_u5fMqXvXUrlsOv8tIE2NRlu6NVP8qtkL2GjhlkeTUbDMF8WvvpPDTFOgvZ4Y16Ej8F8AhWos88mo5B1HssXozw0XrkJQIqERITUu6rqloz9kf4ZzhBHtDAt-IkiAFY_Ds9SW8FYKKTtINJVpHZQ6Gyu1FFM4Dc9MO0maE8_mmNcwlxqyRoRk_MPWW8VyByXWM5RSp52jteRKw7FeI9WIYvCbPAOy0Eyib-aseIQsnGbglBcUY6_2xp8GYaJM38H3dNvBPsSOfJBPndKedwKHllxjkucXn6xsN0sDXkpGN-cu8_2bDTJ0g-uUucKSCooYX-ApSDNGpkA_p9zv1SOAD8c0zaZVmtiBsN75QpVz2rzq9_BFxOywPvR, Configuration="Right Angle", Created By="Flip B", Number of Positions=5, Pitch=0.65mm, Series=10118192, Supplier 1=Digi-Key
J205 J302: library part HEADER_4PIN_2.54MM, Supplier Part Number 1=S1012E-04-ND, Made By="Robert Pafford", Supplier 1=Digi-Key
J206 J303: library part HEADER_2PIN_2.54MM, "CONN HEADER VERT 2POS 2.54MM", Color=Natural, Current Per Pin=1A, Supplier Part Number 1=A121480-ND, ComponentLink1Description=Datasheet, ComponentLink1URL=https://www.molex.com/pdm_docs/sd/026013115_sd.pdf, Configuration=Vertical, Created By="Robert P", Number of Positions=2, Pitch=2.54mm, Supplier 1=Digi-Key, Supplier 2=Mouser, Supplier Part Number 2=571-5-146280-2
R101 R102: library part RESISTOR_4.7K_0805, "RES 4.7k OHM 5% 1/8W 0805", Digikey Part Numer=CR0603-JW-104ELFTR-ND, Tolerance="+/- 5%", Value  (Ohms)=4.7K, ComponentLink1Description=Datasheet, Made By="Robert Pafford", Supplier=Digikey, Wattage=1/8W
R103 R104 R105 R106 R107 R108 R109 R110 R111 R112 R113 R114 R115 R116 R117 R118 R119 R205 R211 R307 R309: library part RESISTOR_10K_0603, "RES 10k OHM 5% 1/10W 0603", Digikey Part Numer=CR0603-JW-104ELFTR-ND, Supplier Part Number 1=2019-RK73B1JTTD103JCT-ND, Tolerance="+/- 5%", Value  (Ohms)=10K, ComponentLink1Description=Datasheet, ComponentLink1URL=https://www.bourns.com/docs/product-datasheets/CRxxxxx.pdf, Made By="Robert Pafford", Supplier=Digikey, Supplier 1=Digi-Key, Wattage=1/8W
R201 R204 R303 R308: library part RESISTOR_1K_0603, "RES 1k OHM 5% 1/8W 0603", Digikey Part Numer=CR0603-JW-104ELFTR-ND, Supplier Part Number 1=2019-RK73B1JTTD102JCT-ND, Tolerance="+/- 5%", Value  (Ohms)=1K, ComponentLink1Description=Datasheet, ComponentLink1URL=https://www.bourns.com/docs/product-datasheets/CRxxxxx.pdf, Made By="Robert Pafford", Supplier=Digikey, Supplier 1=Digi-Key, Wattage=1/8W
R202 R203 R301 R302: library part RESISTOR_27_0603, "RES 27 OHM 5% 1/8W 0603", Digikey Part Numer=CR0603-JW-104ELFTR-ND, Supplier Part Number 1=2019-RK73B1JTTD270JCT-ND, Tolerance="+/- 5%", Value  (Ohms)=27, ComponentLink1Description=Datasheet, ComponentLink1URL=https://www.bourns.com/docs/product-datasheets/CRxxxxx.pdf, Made By="Robert Pafford", Supplier=Digikey, Supplier 1=Digi-Key, Wattage=1/8W
R206 R207 R304 R305 R306: library part RESISTOR_62_0603, "RES SMD 62 OHM 1% 1/4W 0603", Digikey Part Numer=CR0603-JW-104ELFTR-ND, Supplier Part Number 1=541-RCS060362R0FKEACT-ND, Tolerance="+/- 1%", Value  (Ohms)=62, ComponentLink1Description=Datasheet, ComponentLink1URL=https://www.bourns.com/docs/product-datasheets/CRxxxxx.pdf, Made By="Robert Pafford", Supplier=Digikey, Supplier 1=Digi-Key, Wattage=1/4W
S203 S204 S301 S302: library part "Tactile Switch", "SWITCH TACTILE SPST-NO 0.05A 12V", Supplier Part Number 1=EG2494-ND, Made By="Robert Pafford", Supplier 1=Digi-Key
U101: "IC REG LIN 3.3V 800MA SOT223-4", Manufacturer="Texas Instruments", Package=SOT-223-4, PartNumber=LM1117IMP-3.3/NOPB, Supplier Part Number 1=LM1117IMPX-3.3/NOPBCT-ND, Amp Out=800mA, Created By="Dylan T", Supplier 1=Digi-Key, Vin (Max)=15V, Vout (Min/Fixed)=3.3V
U102: "Temperature Sensor Digital, Local 0°C ~ 90°C 16 b 8-TDFN (2.5x2.5)", Operating Range="-40°C ~ 125°C", Operating Voltage="2.15V ~ 5.5V", Supplier Part Number 1=1649-1064-1-ND, Accuracy=±0.2°C, Accuracy Range="0°C ~ 90°C", Interface=I2C, Made By="Robert Pafford", Resolution=16b, Supplier 1=Digi-Key
U103 U104 U105 U106 U107 U108 U109 U110: "N-Channel 30 V 5.8A (Ta) 1.4W (Ta) Surface Mount SOT-23-3", Amp Rating="5.8 A", Package=SOT23-3L, Power Dissipation="1.4W (Ta)", Supplier Part Number 1=785-1004-1-ND, Created By="Dylan T", FET Type=N-Channel, Manufacturer _Part_Number=AO3404A, Rds (on)="28mOhm @ 5.8A, 10V", SourceLibrary=ON_Semiconductor_2020-01-13, Supplier 1=Digi-Key, Vdss=30V, Vendor="Alpha & Omega Semiconductor Inc.", Vgs (Max)="3V @ 5.8A, 10V", Vgs (th)="3V @ 250µA"
U111: "Board Mount Pressure Sensors Dual full-scale 1260hPa 4060hPa absolute digital output barometer embedded Qvar. I2C and SPI", Supplier Part Number 1=511-ILPS22QSTR, Supplier 1=Mouser
U201 U301: "Raspberry Pi RP2040", Crystal Frequency="12 MHz", Input Voltage=3.3V, Available Busses="SPI, I2C, PWM, USB", ComponentLink1Description=DigiKey, ComponentLink2Description=Datasheet, ComponentLink2URL=https://datasheets.raspberrypi.org/rp2040/rp2040-datasheet.pdf, Made By="Robert Pafford", Number of GPIOs=29
U202 U302: "IC FLASH 128MBIT SPI/QUAD 8SOIC", Supplier Part Number 1=W25Q128JVSIQ-ND, Made By="Robert Pafford", Size=128M, Supplier 1=Digi-Key
Y201 Y301: library part CRYSTAL_12MHz_SMD, "12 MHz ±20ppm Crystal 18pF 50 Ohms 4-SMD, No Lead", Frequency="25 MHz", Load Capacitance=18pF, Supplier Part Number 1=XC2312CT-ND, ESR="40 Ohms", Made By="Siddharth Venkatesan", Supplier 1=Digi-Key

## Free pads (board coordinates)
  round 60 hole 165: 1(250,250) 1(250,3750) 1(3750,250) 1(3750,3750)

## Via types
v1: diameter 22, hole 10, Top Layer to Bottom Layer, 174 vias

## Nets (pads, with @x,y where several pads share a name; then routed paths per layer and width w, separated by ;. In a path a pad name is that pad's centre, name@x,y a point inside that pad or via, vN(x,y) a via of type N, cw(c..) or ccw(c..) an arc to the next point about the centre after c; other vN are vias at no path point)
1V1_MCU_Actuator: C314.2 C315.2 C316.2 U301.23 U301.45 U301.50 | length 1047.6
  Top Layer w8: C315.2@2739.94,1609.94 2739.94,1524.7 2755.75,1508.9 U301.50@2755.75,1445.75 2755.75,1408.31 2760.43,1403.63 2834.49,1403.63 ; C314.2@2865,965 2810,965 2787.24,987.76 U301.23@2787.24,1180 2787.24,1207.24 2805,1225 2830,1225 2845,1240 2845,1393.11 2834.49,1403.63 ; C316.2@2945,1515 2850,1515 2834.49,1499.49 U301.45@2834.49,1445.75 2834.49,1403.63
1V1_MCU_Copro: C210.2 C211.2 C219.2 U201.23 U201.45 U201.50 | length 1141.8
  Top Layer w8: C210.2@985,3525 1000,3525 1005,3520 1020,3520 1052.24,3487.76 U201.50@1052.24,3360 1052.31,3359.94 1052.31,3337.69 1065,3325 1130,3325 ; U201.45@1131.05,3346.28 1131.05,3326.05 1130,3325 ; 1131.05,3389.46 1131.05,3392.14 1158.91,3420 C219.2@1245,3420 ; C211.2@1175,2755 1125,2755 1083.74,2796.26 U201.23@1083.74,3094.25 1083.74,3123.74 1100,3140 1120,3140 1140,3160 1140,3315 1130,3325